# Altium PCB PCB_DRumPAddd.pcbdoc
Units mil, origin at the board's own origin, x right, y up, seen from the top; angles counter-clockwise.
Board outline 5550 x 3910 mil, 2 copper layers (Top Layer, Bottom Layer); 26 components, 48 nets, 99 pads, 34 vias.
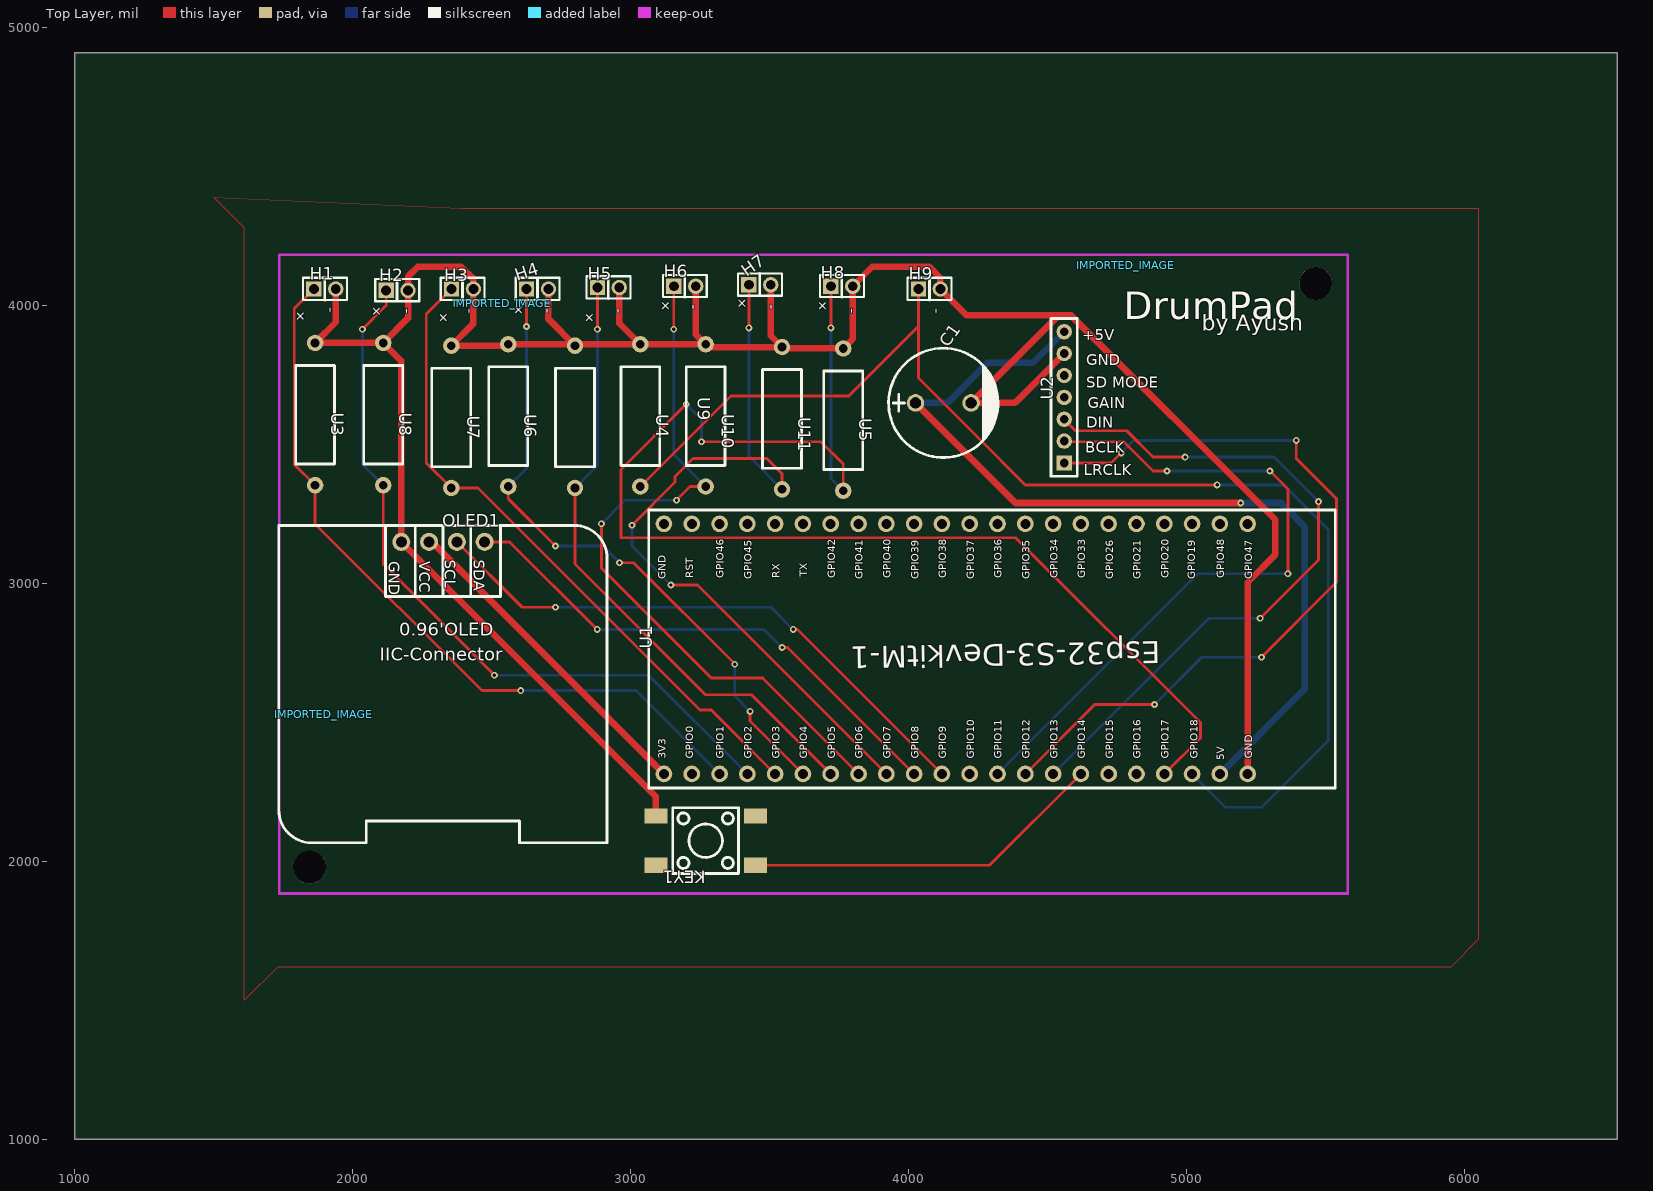
[diagram p0: Top Layer view]
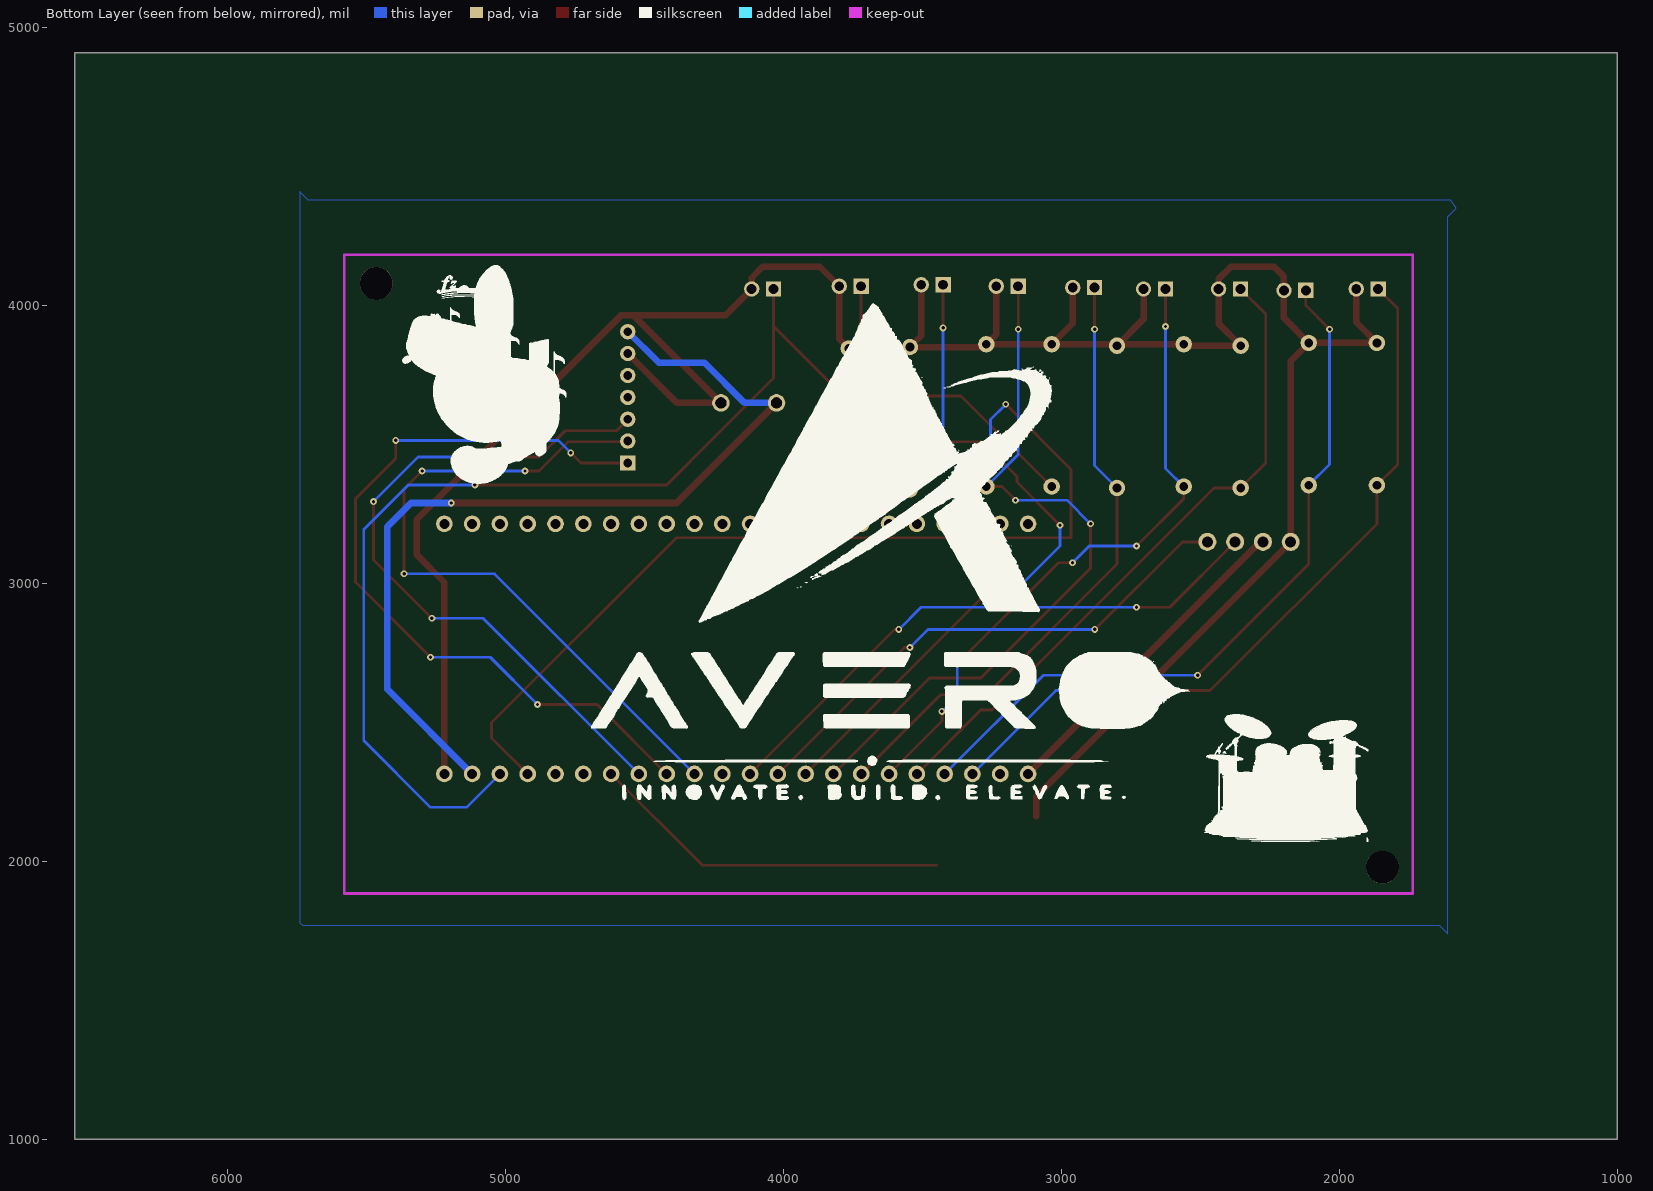
[diagram p1: Bottom Layer view, seen from below]

## Layer stack, top to bottom
Top Layer: signal copper (thickness not stored)
Dielectric: dielectric 12.6, FR-4, Dk 4.8
Bottom Layer: signal copper (thickness not stored)

## Board outline
6550,1000 1000,1000 1000,4910 6550,4910

## Components (designator, comment, footprint, x,y, rotation, side; value= is the part's Value field where it differs from the comment)
C1 "1000µF 25V" CAP-TH_BD10.0-P5.00-D1.0-FD 4125,3650 r0 top
H1 "880-70-002-10-001101" HDR-TH_2P-P2.00-V-M 1900,4059.97 r0 top
H2 "880-70-002-10-001101" HDR-TH_2P-P2.00-V-M 2160,4054.97 r0 top
H3 "880-70-002-10-001101" HDR-TH_2P-P2.00-V-M 2395,4059.97 r0 top
H4 "880-70-002-10-001101" HDR-TH_2P-P2.00-V-M 2665,4059.97 r0 top
H5 "880-70-002-10-001101" HDR-TH_2P-P2.00-V-M 2920,4064.97 r0 top
H6 "880-70-002-10-001101" HDR-TH_2P-P2.00-V-M 3195,4069.97 r0 top
H7 "880-70-002-10-001101" HDR-TH_2P-P2.00-V-M 3465,4074.97 r0 top
H8 "880-70-002-10-001101" HDR-TH_2P-P2.00-V-M 3760,4069.97 r0 top
H9 "880-70-002-10-001101" HDR-TH_2P-P2.00-V-M 4075,4059.97 r0 top
IMPORTED_IMAGE "IMPORTED_IMAGE" IMPORTED_IMAGE 2538.57,4008 r0 top
IMPORTED_IMAGE "IMPORTED_IMAGE" IMPORTED_IMAGE 1895.22,2530.34 r0 top
IMPORTED_IMAGE "IMPORTED_IMAGE" IMPORTED_IMAGE 4781.64,4145.49 r0 top
KEY1 "4PINTACTPCBTHTPUSHBUTTON" SW-SMD_4P-L6.0-W6.0-P4.50-LS10.0_TL3301EF160QG 3270,2075 r180 top
OLED1 "0.96OLED_4P_MODULE_JX" 0.96OLED_4P 2325,3150 r0 top
U1 "Esp32-S3-DevkitM-1" ESP32-S3-DEVKITM-1 3065,2265 r90 top
U2 "HX PM2.0-1X7P ZC" HDR-TH_HX-PM2.0-1X7P-ZC 4560,3670 r90 top
U3 "1mohm" RES-TH_BD3.5-L9.0-P13.00-D0.5 1865,3610 r270 top
U4 "100mΩ" RES-TH_BD3.5-L9.0-P13.00-D0.5 3035,3605 r270 top
U5 "100mΩ" RES-TH_BD3.5-L9.0-P13.00-D0.5 3765,3590 r270 top
U6 "100mΩ" RES-TH_BD3.5-L9.0-P13.00-D0.5 2560,3605 r270 top
U7 "100mΩ" RES-TH_BD3.5-L9.0-P13.00-D0.5 2355,3600 r270 top
U8 "100mΩ" RES-TH_BD3.5-L9.0-P13.00-D0.5 2110,3610 r270 top
U9 "100mΩ" RES-TH_BD3.5-L9.0-P13.00-D0.5 2800,3600 r270 top
U10 "100mΩ" RES-TH_BD3.5-L9.0-P13.00-D0.5 3270,3605 r270 top
U11 "100mΩ" RES-TH_BD3.5-L9.0-P13.00-D0.5 3545,3595 r270 top

## Footprints (in the part's own frame and the unit in brackets; to place one, negate y for a bottom-side part, rotate by r counter-clockwise, add the part's x,y. Pads: shape width x height; smd on the part's side, far side on the other; paste and mask are expansions set on the pad)
0.96OLED_4P [mm]
  round 1.65 hole 1 paste+0 mask+0.051: 1(-3.81,-0.001) 2(-1.27,0.002) 3(1.27,0.002) 4(3.81,0.002)
  silkscreen extent -15,-27.5 15,1.5
CAP-TH_BD10.0-P5.00-D1.0-FD [mm]
  round 1.6 hole 1 slot 1.005 at 0 deg paste+0 mask+0.051: 1(-2.54,0) 2(2.54,0)
  silkscreen extent -5,-5 5.08,5
ESP32-S3-DEVKITM-1 [mil]
  round 60 hole 36 paste+0 mask+2: 1(50,-55.12) 2(50,-155.12) 3(50,-255.12) 4(50,-355.12) 5(50,-455.12) 6(50,-555.12) 7(50,-655.12) 8(50,-755.12) 9(50,-855.12) 10(50,-955.12) 11(50,-1055.12) 12(50,-1155.11) 13(50,-1255.11) 14(50,-1355.11) 15(50,-1455.11) 16(50,-1555.11) 17(50,-1655.11) 18(50,-1755.11) 19(50,-1855.11) 20(50,-1955.11) 21(50,-2055.11) 22(50,-2155.11) 23(950,-2155.11) 24(950,-2055.11) 25(950,-1955.1) 26(950,-1855.1) 27(950,-1755.1) 28(950,-1655.1) 29(950,-1555.11) 30(950,-1455.1) 31(950,-1355.1) 32(950,-1255.1) 33(950,-1155.11) 34(950,-1055.11) 35(950,-955.1) 36(950,-855.11) 37(950,-755.11) 38(950,-655.1) 39(950,-555.09) 40(950,-455.09) 41(950,-355.1) 42(950,-255.1) 43(950,-155.11) 44(950,-55.11)
  silkscreen extent 0,-2470 1000,0
HDR-TH_2P-P2.00-V-M [mm]
  rect 1.4x1.4 hole 0.9 paste+0 mask+0.051: 1(-1,0)
  round 1.4 hole 0.9 paste+0 mask+0.051: 2(1,0)
  silkscreen extent -1.99,-1 2.02,1.03
HDR-TH_HX-PM2.0-1X7P-ZC [mm]
  rect 1.4x1.4 hole 0.8 paste+0 mask+0.051: 1(-6,0)
  round 1.4 hole 0.8 paste+0 mask+0.051: 2(-4,0) 3(-2,0) 4(0,0) 5(2,0) 6(4,0) 7(6,0)
  silkscreen extent -7.2,-1.2 7.2,1.2
IMPORTED_IMAGE [mil]
RES-TH_BD3.5-L9.0-P13.00-D0.5 [mm]
  round 1.5 hole 0.8 paste+0 mask+0.051: 1(-6.5,0) 2(6.5,0)
  silkscreen extent -4.44,-1.78 4.57,1.78
SW-SMD_4P-L6.0-W6.0-P4.50-LS10.0_TL3301EF160QG [mm]
  rect 2.1x1.4 smd paste+0 mask+0.051: 1(-4.55,2.25) 2(4.55,2.25) 3(-4.55,-2.25) 4(4.55,-2.25)
  silkscreen extent -3,-3 3,3

## Free pads (board coordinates)
  round 118.11 hole 118.11 unplated paste+0: ""(1845,1980) ""(5465,4080)

## Via types
v1: diameter 24.41, hole 12.2, Top Layer to Bottom Layer, tented both sides, 34 vias

## Nets (pads, with @x,y where several pads share a name; then routed paths per layer and width w, separated by ;. In a path a pad name is that pad's centre, name@x,y a point inside that pad or via, vN(x,y) a via of type N, cw(c..) or ccw(c..) an arc to the next point about the centre after c; other vN are vias at no path point)
5V: C1.1 U1.21 U2.7 | length 3241.7
  Top Layer w23.62: C1.1 4385,3290 v1(5195,3290)
  Bottom Layer w23.62: C1.1 4140,3650 4285,3795 4448.78,3795 U2.7 ; U1.21 5425,2619.89 5425,3205 5340,3290 v1(5195,3290)
BCLK: U1.13 U2.2 | length 2524.6
  Top Layer w10: U2.2 4562.51,3510 4775,3510 4880,3405 v1(4930,3405) ; v1(5300,3405) 5365,3340 v1(5365,3035)
  Bottom Layer w10: U1.13 5040.12,3035 v1(5365,3035) ; v1(4930,3405) v1(5300,3405)
DIN: U1.15 U2.3 | length 2521.5
  Top Layer w10: U2.3 4601.25,3550 4785,3550 4880,3455 v1(4995,3455) ; v1(5265,2875) 5475,3085 v1(5475,3295)
  Bottom Layer w10: U1.15 5080.12,2875 v1(5265,2875) ; v1(4995,3455) 5315,3455 v1(5475,3295)
GND: C1.2 H1.2 H2.2 H3.2 H4.2 H5.2 H6.2 H7.2 H8.2 H9.2 KEY1.4 OLED1.1 U1.22 U2.6 U3.1 U4.1 U5.1 U6.1 U7.1 U8.1 U9.1 U10.1 U11.1 | length 9932.4
  Top Layer w23.62: H1.2 1939.37,3940.28 U3.1 U8.1 ; H4.2 2704.37,3951.54 U9.1 ; H5.2 2959.37,3936.54 U4.1 ; KEY1.4 3090.87,2234.08 OLED1.1 2175,3800.91 U8.1 ; H6.2 3234.37,3896.54 U10.1 ; H7.2 3504.37,3891.54 U11.1 ; 4315,3740 C1.2 ; U2.6 4382.52,3650 C1.2 ; U1.22 5220.11,3005.11 5320,3105 5320,3230 4585,3965 ; U8.1 2199.37,3955.28 H2.2 2199.37,4104.37 2235,4140 2390,4140 2434.37,4095.63 H3.2 2434.37,3935.28 U7.1 2555,3855.91 U6.1 2795,3860.91 U9.1 ; U9.1 2805,3860.91 U4.1 ; U4.1 U10.1 ; U10.1 3280,3850.91 U11.1 ; U11.1 3550,3845.91 U5.1 3799.37,3880.28 H8.2 3869.37,4140 4075,4140 4114.37,4100.63 H9.2 4209.37,3965 4585,3965 ; C1.2 4540,3965 4585,3965
KEY1_2: KEY1.2
KEY1_3: KEY1.3
LRCLK: U1.14 U2.1 | length 2851.5
  Top Layer w10: U1.14 4670.12,2565 v1(4885,2565) ; U2.1 4728.78,3433.78 v1(4765,3470) v1@4760,3465 ; v1(5270,2735) 5540,3005 5540,3305 5395,3450 v1(5395,3515)
  Bottom Layer w10: v1(4765,3470) 4810,3515 v1(5395,3515) ; v1(4885,2565) 5055,2735 v1(5270,2735)
PAD1: H1.1 U1.3 U3.2 | length 2733.2
  Top Layer w10: H1.1 1790,3989.37 1790,3429.09 U3.2 1865,3215 2465,2615 v1(2605,2615)
  Bottom Layer w10: v1(2605,2615) 3020.12,2615 U1.3
PAD2: H2.1 U1.4 U8.2 | length 2674.4
  Top Layer w10: v1(2035,3915) 2120.63,4000.63 H2.1 ; U8.2 2110,3070 v1(2510,2670)
  Bottom Layer w10: v1(2035,3915) 2035,3429.09 U8.2 ; v1(2510,2670) 3065.12,2670 U1.4
PAD3: H3.1 U1.5 U7.2 | length 2382.1
  Top Layer w10: H3.1 2265,3969.37 2265,3434.09 U7.2 2450.91,3344.09 3250,2545 3290.12,2545 U1.5
PAD4: H4.1 U1.6 U6.2 | length 2340.2
  Top Layer w10: U6.2 2560,3305 v1(2730,3135) ; v1(2625.63,3925) H4.1 ; v1(2960,3075) 3010,3075 v1(3375,2710) ; v1(3430,2540) 3430,2505.12 U1.6
  Bottom Layer w10: U6.2 2625.63,3414.72 v1(2625.63,3925) ; v1(2730,3135) 2900,3135 v1(2960,3075) ; v1(3375,2710) 3375,2595 v1(3430,2540)
PAD5: H5.1 U1.7 U9.2 | length 2261.3
  Top Layer w10: U9.2 2800,3070 3270,2600 3435.12,2600 U1.7 ; v1(2880.63,3915) H5.1
  Bottom Layer w10: U9.2 2880.63,3424.72 v1(2880.63,3915)
PAD6: H6.1 U1.8 U10.2 | length 2590.5
  Top Layer w10: v1(2895,3215) 2895,3055 3290,2660 3475.12,2660 U1.8 ; v1(3155.63,3915) H6.1 ; v1(3165,3300) 3214.09,3349.09 U10.2
  Bottom Layer w10: v1(2895,3215) 2980,3300 v1(3165,3300) ; v1(3155.63,3915) 3155.63,3463.46 U10.2
PAD7: H7.1 U1.9 U11.2 | length 2844.9
  Top Layer w10: v1(3005,3210) 3160,3365 3160,3385 3225,3450 3490,3450 3545,3395 U11.2 ; v1(3145,2995) 3240.12,2995 U1.9 ; v1(3425.63,3920) H7.1
  Bottom Layer w10: v1(3005,3210) 3005,3135 v1(3145,2995) ; v1(3425.63,3920) 3425.63,3458.46 U11.2
PAD8: H8.1 U1.19 U5.2 | length 4727.7
  Top Layer w10: v1(3200,3645) 2965,3410 2965,3165 4385,3165 5050,2500 5050,2444.88 U1.19 ; v1(3255,3510) 3685,3510 3765,3430 U5.2 ; v1(3720.63,3920) H8.1
  Bottom Layer w10: v1(3200,3645) 3255,3590 v1(3255,3510) ; v1(3720.63,3920) 3720.63,3378.46 U5.2
PAD9: H9.1 U1.20 U4.2 | length 4808.9
  Top Layer w10: U4.2 3360.91,3675 3785,3675 4035.63,3925.63 H9.1 ; H9.1@4035.63,4044.37 H9.1 ; v1(5110,3355) 4420,3355 4250,3525 4035.63,3739.37 H9.1
  Bottom Layer w10: U1.20 5140.12,2195 5270,2195 5510,2435 5510,3195 5350,3355 v1(5110,3355)
SCL: OLED1.3 U1.11 | length 2091
  Top Layer w10: OLED1.3@2375,3150.05 2610.05,2915 v1(2730,2915) ; v1(3585,2835) 3600.12,2835 U1.11
  Bottom Layer w10: v1(2730,2915) 3505,2915 v1(3585,2835)
SDA: OLED1.4 U1.10 | length 1891
  Top Layer w10: OLED1.4@2475,3150.05 2564.95,3150.05 v1(2880,2835) ; v1(3545,2770) 3565.12,2770 U1.10
  Bottom Layer w10: v1(2880,2835) 3480,2835 v1(3545,2770)
SW: KEY1.1 U1.16 | length 1307.1
  Top Layer w10: KEY1.1 4291.54,1986.42 U1.16
U1_2: U1.2
U1_12: U1.12
U1_17: U1.17
U1_18: U1.18
U1_23: U1.23
U1_24: U1.24
U1_25: U1.25
U1_26: U1.26
U1_27: U1.27
U1_28: U1.28
U1_29: U1.29
U1_30: U1.30
U1_31: U1.31
U1_32: U1.32
U1_33: U1.33
U1_34: U1.34
U1_35: U1.35
U1_36: U1.36
U1_37: U1.37
U1_38: U1.38
U1_39: U1.39
U1_40: U1.40
U1_41: U1.41
U1_42: U1.42
U1_43: U1.43
U1_44: U1.44
U2_4: U2.4
U2_5: U2.5
VCC: OLED1.2 U1.1 | length 1191
  Top Layer w23.62: OLED1.2@2275,3150.05 2285.07,3150.05 U1.1

## Polygon pours and split planes (outlines as drawn)
GND on Top Layer (solid): 2390,4350 6050,4350 6050,1720 5950,1620 1730,1620 1610,1500 1610,4280 1500,4390
GND on Bottom Layer (solid): 1600,4380 5710,4380 5740,4410 5740,1780 5730,1770 1640,1770 1610,1740 1610,4320 1580,4350

## Silkscreen, mask and mechanical layers (free items; w line width, h text height)
Top Overlay:
  text "+" at 3428.92,4003.92 h39.37 r135
  text "+" at 3153.92,3993.92 h39.37 r135
  text "+" at 3718.92,3993.92 h39.37 r135
  text "+" at 1816.08,3988.92 h39.37 r225
  text "-" at 3239.68,3985 h39.37 r90
  text "-" at 3519.68,3985 h39.37 r90
  text "+" at 2331.08,3983.92 h39.37 r225
  text "+" at 2856.08,3983.92 h39.37 r225
  text "+" at 2623.92,3978.92 h39.37 r135
  text "-" at 1934.68,3975 h39.37 r90
  text "+" at 2113.92,3973.92 h39.37 r135
  text "-" at 2209.68,3970 h39.37 r90
  text "-" at 2434.68,3970 h39.37 r90
  text "-" at 2714.68,3970 h39.37 r90
  text "-" at 2969.68,3970 h39.37 r90
  text "-" at 3809.68,3970 h39.37 r90
  text "-" at 4114.69,3970 h39.37 r90
  text "DrumPad" at 4775,3950.79 h98.42
  text "by Ayush" at 5055,3890 h98.42
  text "+5V" at 4625,3875.32 h39.37
  text "GND" at 4640,3785.32 h39.37
  text "SD MODE" at 4640,3705.32 h39.37
  text "GAIN" at 4645,3630.32 h39.37
  text "DIN" at 4640,3560.32 h39.37
  text "BCLK" at 4635,3470.32 h39.37
  text "LRCLK" at 4630,3390.32 h39.37
  text "SCL" at 2330.55,3084.89 h39.37 r270
  text "SDA" at 2435.32,3085 h39.37 r270
  text "GND" at 2130.32,3080 h39.37 r270
  text "VCC" at 2240.32,3080 h39.37 r270

## Text inside footprints (layer, text, board x,y; h text height)
OLED1: Top Overlay "IIC-Connector" at 2098.4,2722.94 h47.24; Top Overlay "0.96'OLED" at 2167.6,2811.43 h47.24
U1: Top Overlay "GPIO0" at 3235,2370 h47.24 r90; Top Overlay "GPIO1" at 3345,2370 h47.24 r90; Top Overlay "GPIO2" at 3445,2370 h47.24 r90; Top Overlay "GPIO3" at 3545,2370 h47.24 r90; Top Overlay "GPIO4" at 3645,2370 h47.24 r90; Top Overlay "GPIO5" at 3745,2370 h47.24 r90; Top Overlay "GPIO6" at 3845,2370 h47.24 r90; Top Overlay "GPIO7" at 3945,2370 h47.24 r90; Top Overlay "GPIO8" at 4045,2370 h47.24 r90; Top Overlay "GPIO9" at 4145,2370 h47.24 r90; Top Overlay "GPIO10" at 4245,2370 h47.24 r90; Top Overlay "GPIO11" at 4345,2370 h47.24 r90; Top Overlay "GPIO12" at 4445,2370 h47.24 r90; Top Overlay "GPIO13" at 4545,2370 h47.24 r90; Top Overlay "GPIO14" at 4645,2370 h47.24 r90; Top Overlay "GPIO15" at 4745,2370 h47.24 r90; Top Overlay "GPIO17" at 4945,2370 h47.24 r90; Top Overlay "GPIO16" at 4845,2370 h47.24 r90; Top Overlay "GPIO18" at 5050,2370 h47.24 r90; Top Overlay "3V3" at 3135,2370 h47.24 r90; Top Overlay "5V" at 5145,2365 h47.24 r90; Top Overlay "GND" at 5245,2370 h47.24 r90; Top Overlay "RST" at 3235,3020 h47.24 r90; Top Overlay "RX" at 3545,3020 h47.24 r90; Top Overlay "TX" at 3645,3025 h47.24 r90; Top Overlay "GND" at 3135,3015 h47.24 r90; Top Overlay "GPIO46" at 3345,3020 h47.24 r90; Top Overlay "GPIO45" at 3445,3015 h47.24 r90; Top Overlay "GPIO42" at 3745,3020 h47.24 r90; Top Overlay "GPIO41" at 3845,3015 h47.24 r90; Top Overlay "GPIO40" at 3945,3020 h47.24 r90; Top Overlay "GPIO39" at 4045,3015 h47.24 r90; Top Overlay "GPIO37" at 4245,3015 h47.24 r90; Top Overlay "GPIO36" at 4345,3020 h47.24 r90; Top Overlay "GPIO35" at 4445,3015 h47.24 r90; Top Overlay "GPIO38" at 4145,3020 h47.24 r90; Top Overlay "GPIO34" at 4545,3020 h47.24 r90; Top Overlay "GPIO33" at 4645,3020 h47.24 r90; Top Overlay "GPIO26" at 4745,3015 h47.24 r90; Top Overlay "GPIO21" at 4845,3015 h47.24 r90; Top Overlay "GPIO20" at 4945,3020 h47.24 r90; Top Overlay "GPIO48" at 5145,3020 h47.24 r90; Top Overlay "GPIO47" at 5245,3015 h47.24 r90; Top Overlay "GPIO19" at 5040,3015 h47.24 r90